# Altium PCB photo_frame-v1.2.PcbDoc (part 3 of 5)
Units mm, origin at the board's own origin, x right, y up, seen from the top; angles counter-clockwise.
Board outline 704 x 370 mm, 2 copper layers (Top Layer, Bottom Layer), stack 1.57 mm thick; 268 components, 235 nets, 1088 pads, 1398 vias.
Unrouted connection lines stored in the file: 10.
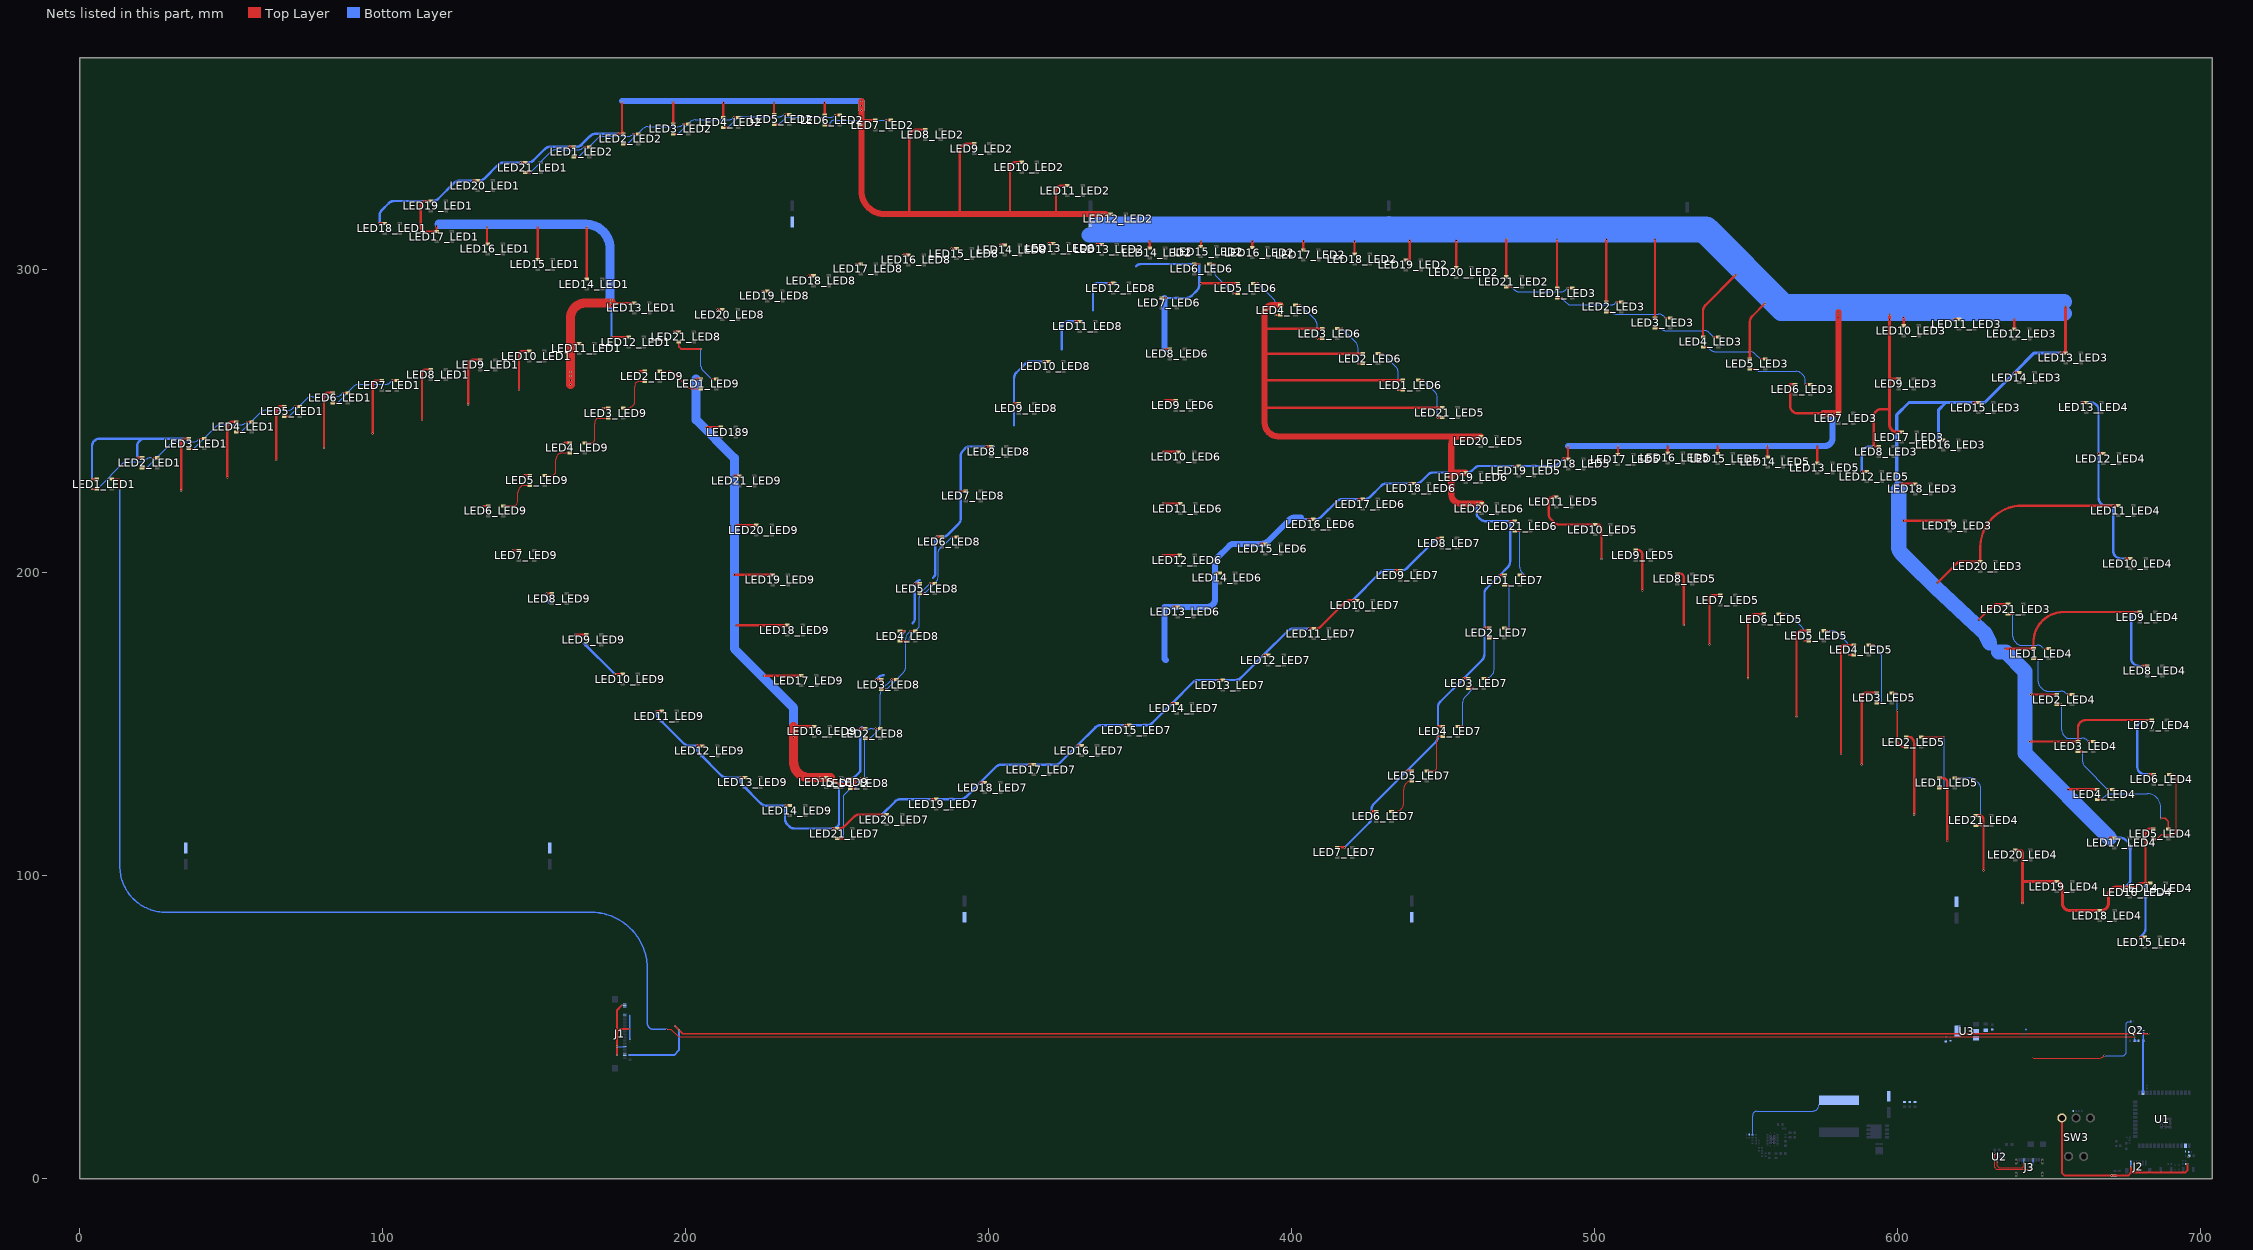
[diagram p2: the nets of this part, all layers, seen from the top]

## Via types
v1: diameter 0.6, hole 0.3, Top Layer to Bottom Layer, 709 vias
v2: diameter 0.6, hole 0.3, Top Layer to Bottom Layer, tented both sides, 689 vias

## Nets (pads, with @x,y where several pads share a name; then routed paths per layer and width w, separated by ;. In a path a pad name is that pad's centre, name@x,y a point inside that pad or via, vN(x,y) a via of type N, cw(c..) or ccw(c..) an arc to the next point about the centre after c; other vN are vias at no path point)
3V3: C1.2 C2.2 C7.1 C11.2 C12.2 D4.2 J1.6 J1.7 J1.12 J1.33 J1.38 J1.39 J1.40 J2.1 Q2.1 R1.1 R2.1 R5.2 R20.1 R23.1 SW3.1 U1.2 U3.2 U3.4 | length 612.3
  Top Layer w0.635: v2(177.444,40.767) v2(177.444,43.536) 177.444,48.336 ; v2(179.019,57.201) 177.444,55.626 177.444,48.336 ; v2(181.61,49.327) 178.435,49.327 177.444,48.336 ; v1(196.596,50.292) 199.109,47.779 211.828,47.779 v1(641.172,47.779) v1(642.422,47.779) v2@682.828,47.779 ; SW3.1@654.296,20.007 654.296,1.925 655.256,0.965 v2(670.712,0.965) 676.123,0.965 677.053,1.896 677.053,2.879 ; v2(677.053,3.858) 677.053,2.879 ; v2(695.811,4.858) 695.811,2.772 695.071,2.032 677.901,2.032 677.053,2.879
  Bottom Layer w0.305: v2(177.444,43.536) 177.419,43.536 177.429,43.546 J1.12@180.165,43.546 ; v2(677.053,3.858) J2.1@677.053,5.137 ; v2@696.112,7.087 v2@696.112,7.112
  Bottom Layer w0.635: R23.1@181.61,45.999 v2(181.61,49.327) 181.61,53.873 ; C7.1@181.686,40.767 196.235,40.767 197.853,42.384 v1(197.853,49.035) v1(196.596,50.292) ; 642.42,49.149 642.422,49.15 ; v2(670.712,0.965) R20.1@671.805,0.965
  other v2: 696.138,7.112 682.835,47.778
5V: C9.2 C10.2 C15.2 C16.2 C17.2 C23.1 C24.1 C25.1 C26.1 C27.1 C28.1 C29.1 C30.1 C31.1 C32.1 L1.2 LED1_LED1.1 LED1_LED2.1 LED1_LED3.1 LED1_LED4.1 LED1_LED5.1 LED1_LED6.1 LED1_LED7.1 LED1_LED8.1 LED1_LED9.1 LED2_LED1.1 LED2_LED2.1 LED2_LED3.1 LED2_LED4.1 LED2_LED5.1 LED2_LED6.1 LED2_LED7.1 LED2_LED8.1 LED2_LED9.1 LED3_LED1.1 LED3_LED2.1 LED3_LED3.1 LED3_LED4.1 LED3_LED5.1 LED3_LED6.1 LED3_LED7.1 LED3_LED8.1 LED3_LED9.1 LED4_LED1.1 LED4_LED2.1 LED4_LED3.1 LED4_LED4.1 LED4_LED5.1 LED4_LED6.1 LED4_LED7.1 LED4_LED8.1 LED4_LED9.1 LED5_LED1.1 LED5_LED2.1 LED5_LED3.1 LED5_LED4.1 LED5_LED5.1 LED5_LED6.1 LED5_LED7.1 LED5_LED8.1 LED5_LED9.1 LED6_LED1.1 LED6_LED2.1 LED6_LED3.1 LED6_LED4.1 LED6_LED5.1 LED6_LED6.1 LED6_LED7.1 LED6_LED8.1 LED6_LED9.1 LED7_LED1.1 LED7_LED2.1 LED7_LED3.1 LED7_LED4.1 LED7_LED5.1 LED7_LED6.1 LED7_LED7.1 LED7_LED8.1 LED7_LED9.1 LED8_LED1.1 LED8_LED2.1 LED8_LED3.1 LED8_LED4.1 LED8_LED5.1 LED8_LED6.1 LED8_LED7.1 LED8_LED8.1 LED8_LED9.1 LED9_LED1.1 LED9_LED2.1 LED9_LED3.1 LED9_LED4.1 LED9_LED5.1 LED9_LED6.1 LED9_LED7.1 LED9_LED8.1 LED9_LED9.1 LED10_LED1.1 LED10_LED2.1 LED10_LED3.1 LED10_LED4.1 LED10_LED5.1 LED10_LED6.1 LED10_LED7.1 LED10_LED8.1 LED10_LED9.1 LED11_LED1.1 LED11_LED2.1 LED11_LED3.1 LED11_LED4.1 LED11_LED5.1 LED11_LED6.1 LED11_LED7.1 LED11_LED8.1 LED11_LED9.1 LED12_LED1.1 LED12_LED2.1 LED12_LED3.1 LED12_LED4.1 LED12_LED5.1 LED12_LED6.1 LED12_LED7.1 LED12_LED8.1 LED12_LED9.1 LED13_LED1.1 LED13_LED2.1 LED13_LED3.1 LED13_LED4.1 LED13_LED5.1 LED13_LED6.1 LED13_LED7.1 LED13_LED8.1 LED13_LED9.1 LED14_LED1.1 LED14_LED2.1 LED14_LED3.1 LED14_LED4.1 LED14_LED5.1 LED14_LED6.1 LED14_LED7.1 LED14_LED8.1 LED14_LED9.1 LED15_LED1.1 LED15_LED2.1 LED15_LED3.1 LED15_LED4.1 LED15_LED5.1 LED15_LED6.1 LED15_LED7.1 LED15_LED8.1 LED15_LED9.1 LED16_LED1.1 LED16_LED2.1 LED16_LED3.1 LED16_LED4.1 LED16_LED5.1 LED16_LED6.1 LED16_LED7.1 LED16_LED8.1 LED16_LED9.1 LED17_LED1.1 LED17_LED2.1 LED17_LED3.1 LED17_LED4.1 LED17_LED5.1 LED17_LED6.1 LED17_LED7.1 LED17_LED8.1 LED17_LED9.1 LED18_LED1.1 LED18_LED2.1 LED18_LED3.1 LED18_LED4.1 LED18_LED5.1 LED18_LED6.1 LED18_LED7.1 LED18_LED8.1 LED18_LED9.1 LED19_LED1.1 LED19_LED2.1 LED19_LED3.1 LED19_LED4.1 LED19_LED5.1 LED19_LED6.1 LED19_LED7.1 LED19_LED8.1 LED19_LED9.1 LED20_LED1.1 LED20_LED2.1 LED20_LED3.1 LED20_LED4.1 LED20_LED5.1 LED20_LED6.1 LED20_LED7.1 LED20_LED8.1 LED20_LED9.1 LED21_LED1.1 LED21_LED2.1 LED21_LED3.1 LED21_LED4.1 LED21_LED5.1 LED21_LED6.1 LED21_LED7.1 LED21_LED8.1 LED21_LED9.1 LED189.1 R6.2 R14.2 R15.2 U3.3 | length 4649.2
  Top Layer w0.381: v1(644.525,39.675) 666.333,39.675 ccw(c666.333,42.215) 668.129,40.419 v2(668.299,40.589)
  Top Layer w0.7: v2(175.567,288.999) LED13_LED1.1@183.067,288.999
  Top Layer w0.762: v2@4.092,230.845 LED1_LED1.1@5.688,230.845 ; v2@19.021,237.902 LED2_LED1.1@20.617,237.902 ; v1(33.528,227.076) 33.528,242.824 cw(c34.907,242.824) 34.907,244.203 ; v2@34.495,244.203 34.907,244.203 ; LED3_LED1.1@36.091,244.203 34.907,244.203 ; v1(48.768,231.394) 48.768,248.158 cw(c50.374,248.158) 50.374,249.764 LED4_LED1.1@51.783,249.764 ; v1(64.934,237.161) v1(64.934,237.161) 64.936,253.6 cw(c66.205,253.6) 66.205,254.869 LED5_LED1.1@67.632,254.869 ; v1(80.715,241.103) 80.715,258.071 cw(c81.984,258.071) 81.984,259.34 LED6_LED1.1@83.558,259.34 ; v1(96.738,245.908) 96.738,262.185 cw(c97.956,262.185) 97.956,263.404 LED7_LED1.1@99.763,263.404 ; v2@99.074,315.289 LED18_LED1.1@100.669,315.289 ; v1(113.03,250.444) 113.03,265.938 cw(c114.102,265.938) 114.102,267.01 LED8_LED1.1@115.892,267.01 ; LED19_LED1.1@115.943,322.661 115.941,322.66 114.349,322.66 v2(114.347,322.658) ccw(c114.347,320.954) 113.142,322.159 113.106,322.123 ccw(c114.21,321.019) 112.649,321.019 112.649,314.302 ccw(c114.557,314.302) 113.208,312.953 ccw(c114.137,313.883) 114.137,312.568 LED17_LED1.1@117.852,312.568 v2@117.852,314.286 ; v1(128.27,255.524) 128.27,268.732 cw(c129.766,268.732) 129.766,270.228 LED9_LED1.1@132.213,270.228 ; v2@129.849,329.361 LED20_LED1.1@131.444,329.361 ; v2@133.245,222.002 LED6_LED9.1@134.841,222.002 ; v2(134.466,313.944) 134.466,308.727 ccw(c134.666,308.727) LED16_LED1.1@134.666,308.527 ; v2(143.002,207.321) 143.028,207.295 LED7_LED9.1@145.026,207.295 ; v1(145.034,260.35) 145.034,271.78 cw(c146.386,271.78) 146.386,273.132 LED10_LED1.1@148.455,273.132 ; v2@145.564,335.336 LED21_LED1.1@147.16,335.336 ; v2@146.961,232.085 LED5_LED9.1@148.557,232.085 ; LED15_LED1.1@151.259,303.381 v2(151.259,314.069) ; v2@154.226,193.096 LED8_LED9.1@155.821,193.096 ; v2@160.169,242.804 LED4_LED9.1@161.765,242.804 ; v2@161.592,340.518 LED1_LED2.1@163.187,340.518 ; 162.052,274.32 cw(c163.353,274.32) 163.353,275.621 LED11_LED1.1@164.864,275.621 ; v2(163.512,179.508) 163.539,179.482 LED9_LED9.1@167.2,179.482 ; LED14_LED1.1@167.458,296.873 v2(167.458,313.872) ; v2@172.895,254.285 LED3_LED9.1@174.49,254.285 ; v2(175.565,277.751) v2(175.565,277.751) LED12_LED1.1@181.28,277.749 ; v2(176.634,166.503) LED10_LED9.1@179.265,166.503 ; v2@177.822,344.811 LED2_LED2.1@179.418,344.811 cw(c180.257,345.65) 179.07,345.65 v2(179.07,355.346) ; v2@184.909,266.452 LED2_LED9.1@186.504,266.452 ; v2@190.522,154.285 LED11_LED9.1@192.118,154.285 ; v2(195.834,355.346) 195.928,355.252 LED3_LED2.1@195.928,348.062 ; v2@196.186,279.456 LED21_LED8.1@197.782,279.456 ; v2@203.502,263.937 LED1_LED9.1@205.097,263.937 ; v2@203.883,142.83 LED12_LED9.1@205.478,142.83 ; v2(206.756,247.904) 206.889,248.037 LED189.1@211.65,248.037 ; v2@210.588,286.822 LED20_LED8.1@212.184,286.822 ; LED4_LED2.1@212.489,350.221 v2(212.489,355.092) ; v2(216.125,199.275) 216.157,199.243 LED19_LED9.1@228.77,199.243 ; v2@216.125,231.933 LED21_LED9.1@217.721,231.933 ; v2(216.662,182.626) 216.668,182.632 LED18_LED9.1@233.647,182.632 ; v2(216.662,215.646) 216.668,215.652 LED20_LED9.1@223.411,215.652 ; v2@218.056,132.39 LED13_LED9.1@219.651,132.39 ; v2@225.396,292.944 LED19_LED8.1@226.992,292.944 ; v2(225.806,165.862) 225.914,165.97 LED17_LED9.1@238.208,165.97 ; LED5_LED2.1@229.227,351.262 v2(229.227,355.092) ; v2@232.864,123.094 LED14_LED9.1@234.46,123.094 ; v2@240.662,297.973 LED18_LED8.1@242.257,297.973 ; LED6_LED2.1@245.94,350.983 v2(245.94,355.092) ; v2(247.904,132.378) 248.149,132.378 248.837,131.69 249.684,130.843 ccw(c251.48,132.639) 251.48,130.099 255.19,130.099 ccw(c255.19,130.966) 255.803,130.353 255.875,130.424 ccw(c255.311,130.988) 256.108,130.988 256.108,131.371 ccw(c255.501,131.371) 255.93,131.801 ccw(c255.304,131.174) 255.304,132.06 LED1_LED8.1@254.399,132.06 v2@252.803,132.06 ; v2@248.465,115.533 LED21_LED7.1@250.06,115.533 250.701,115.533 ccw(c250.701,118.073) 252.497,116.276 255.62,119.4 cw(c257.417,117.604) 257.417,120.144 v2(264.893,120.144) ; v2@256.257,301.859 LED17_LED8.1@257.853,301.859 ; v2@257.705,148.494 LED2_LED8.1@259.301,148.494 ; 258.064,348.496 cw(c258.899,348.496) 258.899,349.332 LED7_LED2.1@262.679,349.332 ; v2@263.014,164.699 LED3_LED8.1@264.609,164.699 ; v2@264.893,120.148 LED20_LED7.1@266.489,120.148 ; LED4_LED8.1@270.807,180.676 v2@272.403,180.676 ; v2@271.991,304.855 LED16_LED8.1@273.586,304.855 ; 273.812,318.366 273.812,343.668 cw(c276.352,343.668) 276.352,346.208 LED8_LED2.1@279.189,346.208 ; v2@275.688,196.373 LED5_LED8.1@277.284,196.373 ; v2@281.149,125.228 LED19_LED7.1@282.745,125.228 ; v2@282.978,211.816 LED6_LED8.1@284.574,211.816 ; v2@287.855,306.939 LED15_LED8.1@289.451,306.939 ; 290.667,318.366 cw(c290.667,318.457) 290.576,318.457 290.576,339.045 cw(c293.116,339.045) 293.116,341.585 LED9_LED2.1@295.318,341.585 ; v2@290.852,226.929 LED7_LED8.1@292.448,226.929 ; v2@297.253,130.663 LED18_LED7.1@298.849,130.663 ; v2@299.285,241.585 LED8_LED8.1@300.881,241.585 ; v2@303.806,308.184 LED14_LED8.1@305.402,308.184 ; 307.447,318.366 cw(c307.447,318.727) 307.086,318.727 307.086,333.756 cw(c308.768,333.756) 308.768,335.438 LED10_LED2.1@311.015,335.438 ; v2@308.454,255.885 LED9_LED8.1@310.05,255.885 ; v2@313.331,136.581 LED17_LED7.1@314.927,136.581 ; v2@318.132,269.677 LED10_LED8.1@319.727,269.677 ; v2@319.797,308.667 LED13_LED8.1@321.393,308.667 ; 322.572,318.366 cw(c322.572,318.612) 322.326,318.612 322.326,325.994 cw(c324.045,325.994) 324.045,327.713 324.482,327.713 ; 324.482,327.716 LED11_LED2.1@326.077,327.716 ; v2@328.597,282.911 LED11_LED8.1@330.192,282.911 ; v2@329.232,142.855 LED16_LED7.1@330.827,142.855 ; v2@335.759,308.336 LED13_LED2.1@337.355,308.336 ; v2@338.68,318.369 LED12_LED2.1@340.276,318.369 ; v2@339.646,295.509 LED12_LED8.1@341.241,295.509 ; v2@344.929,149.662 LED15_LED7.1@346.524,149.662 ; LED14_LED2.1@353.27,307.167 v2(353.27,309.372) ; LED7_LED6.1@357.198,290.636 v2@358.794,290.636 ; v2(357.553,205.721) LED12_LED6.1@363.125,205.721 ; v1(357.632,222.789) LED11_LED6.1@363.288,222.789 ; v2(357.632,239.854) 357.635,239.858 LED10_LED6.1@362.857,239.858 ; v2(358.143,256.875) LED9_LED6.1@361.754,256.875 ; v2@358.238,273.818 LED8_LED6.1@359.834,273.818 ; v2@360.55,156.825 LED14_LED7.1@362.145,156.825 ; v2@360.931,188.677 LED13_LED6.1@362.526,188.677 ; LED6_LED6.1@367.965,301.864 v2@369.561,301.864 ; v1(370.078,295.465) LED5_LED6.1@382.348,295.465 ; LED15_LED2.1@370.146,307.561 v2(370.146,309.372) ; v2@374.774,199.878 LED14_LED6.1@376.369,199.878 ; v2@375.775,164.546 LED13_LED7.1@377.371,164.546 ; LED16_LED2.1@387.081,307.244 v2(387.081,309.372) ; v2@389.76,209.505 LED15_LED6.1@391.355,209.505 ; v2@390.801,172.776 LED12_LED7.1@392.397,172.776 ; 391.16,279.933 cw(c391.736,279.933) 391.736,280.509 LED3_LED6.1@410.134,280.509 LED3_LED6.1@410.642,280.509 ; LED4_LED6.1@396.342,288.276 LED4_LED6.1@396.888,288.276 ; LED17_LED2.1@403.923,306.495 v2(403.923,309.372) ; v2@405.533,217.607 LED16_LED6.1@407.129,217.607 ; v2@405.711,181.489 LED11_LED7.1@407.307,181.489 408.117,181.489 ccw(c408.117,183.551) 409.575,182.093 417.571,190.088 cw(c419.367,188.292) 419.367,190.832 v2(420.189,190.832) ; LED7_LED7.1@415.079,109.327 417.57,109.327 v2(417.576,109.322) ; v2@420.189,190.836 LED10_LED7.1@421.785,190.836 ; LED18_LED2.1@420.83,305.139 v2(420.83,309.372) ; v2@421.942,224.237 LED17_LED6.1@423.537,224.237 ; v2@426.437,121.214 LED6_LED7.1@428.033,121.214 ; v2@434.311,200.742 LED9_LED7.1@435.907,200.742 ; LED19_LED2.1@437.672,303.225 v2(439.004,303.225) 439.004,309.534 v2(438.912,309.626) ; v2@438.121,134.575 LED5_LED7.1@439.717,134.575 ; v2@438.731,229.418 LED18_LED6.1@440.327,229.418 ; v2@448.053,211.359 LED8_LED7.1@449.648,211.359 ; v2@448.358,149.256 LED4_LED7.1@449.953,149.256 ; v1(454.406,309.626) cw(c454.406,309.606) 454.426,309.606 LED20_LED2.1@454.426,300.76 ; v2@456.841,165.08 LED3_LED7.1@458.437,165.08 ; v2@463.699,181.768 LED2_LED7.1@465.295,181.768 ; v2@468.728,199.142 LED1_LED7.1@470.324,199.142 ; LED21_LED2.1@470.948,297.642 470.948,309.912 v2(471.17,310.134) ; v2@472.183,216.972 LED21_LED6.1@473.778,216.972 ; v2@473.405,235.206 LED19_LED5.1@475.001,235.206 ; LED11_LED5.1@487.342,225.024 486.387,225.024 ccw(c486.387,223.623) 485.395,224.614 485.242,224.46 ccw(c486.039,223.663) 484.911,223.663 484.911,219.365 ccw(c487.451,219.365) 485.655,217.569 486.629,216.595 ccw(c488.425,218.391) 488.425,215.851 498.624,215.851 ; LED1_LED3.1@487.672,293.884 487.672,309.872 v2(487.68,309.88) ; v2@489.703,237.558 LED18_LED5.1@491.298,237.558 v2(491.298,241.808) ; 498.624,215.855 LED10_LED5.1@500.22,215.855 501.038,215.855 cw(c501.038,214.365) 501.88,215.594 ; 501.879,215.595 cw(c500.713,214.43) 501.88,215.594 ; v1(502.361,204.47) 502.361,214.43 ccw(c500.713,214.43) 502.352,214.599 ccw(c500.713,214.43) 501.88,215.594 ; LED2_LED3.1@503.928,289.337 503.928,309.872 v2(503.936,309.88) ; LED17_LED5.1@507.781,238.981 v2(507.781,241.808) ; LED9_LED5.1@513.58,207.371 514.509,207.371 cw(c514.509,206.051) 515.442,206.985 cw(c514.584,206.126) 515.798,206.126 v1(515.798,194.132) ; v2(519.938,309.88) 520.006,309.812 LED3_LED3.1@520.006,284.054 ; LED16_LED5.1@524.214,239.543 v2(524.214,241.808) ; LED8_LED5.1@527.347,199.573 528.504,199.573 cw(c528.504,198.683) 529.134,199.313 cw(c528.34,198.518) 529.463,198.518 v1(529.463,182.753) ; LED4_LED3.1@535.856,277.78 535.856,286.392 cw(c538.396,286.392) 536.6,288.188 v1(546.608,298.196) ; 535.856,281.263 535.856,281.265 ; v1(537.972,176.276) 537.972,191.262 cw(c539.273,191.262) 539.273,192.563 LED7_LED5.1@541.495,192.563 ; LED15_LED5.1@540.69,239.299 v2(540.69,241.808) ; v1(550.672,165.1) 550.672,183.75 cw(c553.212,183.75) 553.212,186.29 LED6_LED5.1@555.882,186.29 ; LED5_LED3.1@551.325,270.541 551.325,282.81 cw(c553.865,282.81) 552.069,284.607 v1(556.26,288.798) ; LED14_LED5.1@557.148,238.227 v2(557.148,241.808) ; 564.615,262.14 564.615,255.016 ccw(c567.046,255.016) 567.046,252.585 v2(575.564,252.585) ; 564.615,262.143 LED6_LED3.1@566.211,262.143 ; v1(566.674,152.4) 566.674,179.153 cw(c568.324,179.153) 568.324,180.803 LED5_LED5.1@570.679,180.803 ; LED13_LED5.1@573.557,236.22 v2(573.557,241.808) ; v1(581.403,140.211) 581.403,174.896 cw(c582.636,174.896) 582.636,176.129 LED4_LED5.1@585.538,176.129 586.3,176.129 ; v1(588.144,136.652) 588.264,136.772 588.264,159.004 cw(c589.565,159.004) 589.565,160.305 LED3_LED5.1@593.184,160.305 ; v2@588.225,233.306 LED12_LED5.1@589.82,233.306 ; v2(592.197,241.586) 592.197,251.399 cw(c594.737,251.399) 594.737,253.939 597.408,253.939 ; v2@592.197,241.59 LED8_LED3.1@593.792,241.59 ; 597.408,263.934 LED9_LED3.1@600.463,263.934 ; v1(600.964,229.305) 600.967,229.308 LED18_LED3.1@605.878,229.308 ; v1(601.98,217.098) LED19_LED3.1@617.254,217.098 ; LED10_LED3.1@602.079,281.475 v1(602.079,284.226) ; LED2_LED5.1@602.861,145.7 604.158,145.7 cw(c604.158,144.9) 604.723,145.466 cw(c602.792,143.534) 605.523,143.534 605.523,120.155 v1(605.536,120.142) ; v1(613.156,196.596) 619.495,202.935 cw(c621.291,201.139) 621.291,203.679 LED20_LED3.1@627.378,203.679 627.378,208.278 cw(c641.181,208.278) 641.181,222.081 LED11_LED4.1@672.838,222.081 ; v2@613.498,243.792 LED16_LED3.1@615.093,243.792 ; LED1_LED5.1@613.877,132.244 614.654,132.244 cw(c614.654,130.124) 616.153,131.623 cw(c615.479,130.948) 616.433,130.948 616.433,111.531 v1(616.458,111.506) ; v2@618.74,283.67 LED11_LED3.1@620.336,283.67 ; v2@625.054,256.113 LED15_LED3.1@626.65,256.113 ; LED21_LED4.1@625.957,119.862 627.144,119.862 cw(c627.144,118.737) 627.939,119.532 cw(c626.687,118.28) 628.457,118.28 v1(628.457,101.661) ; v1(626.872,184.404) 631.283,188.815 cw(c633.079,187.019) 633.079,189.559 LED21_LED3.1@636.52,189.559 ; v1(635.508,174.885) 635.511,174.888 LED1_LED4.1@644.935,174.888 644.935,177.067 cw(c654.849,177.067) 654.849,186.981 LED9_LED4.1@680.074,186.981 ; LED12_LED3.1@638.551,280.465 v1(638.551,283.667) ; v2@638.666,265.969 LED14_LED3.1@640.261,265.969 ; LED20_LED4.1@638.931,108.464 640.342,108.464 cw(c640.342,107.456) 641.35,107.456 641.35,105.664 ; v2(643.636,144.272) 643.642,144.278 LED3_LED4.1@659.614,144.278 659.614,148.78 cw(c662.154,148.78) 662.154,151.32 LED7_LED4.1@683.974,151.32 ; v2(643.912,159.744) LED2_LED4.1@652.642,159.744 ; v2(656.402,128.458) LED4_LED4.1@665.941,128.458 ; 656.978,88.49 ccw(c657.496,90.976) 657.496,88.436 ; v2@660.683,256.148 LED13_LED4.1@662.279,256.148 ; v2@666.409,239.237 LED12_LED4.1@668.004,239.237 ; v2@670.02,112.455 LED17_LED4.1@671.615,112.455 ; v2(675.132,204.632) ccw(c675.158,204.632) 675.158,204.606 LED10_LED4.1@676.918,204.606 ; LED16_LED4.1@676.773,96.19 677.687,96.19 ccw(c677.687,98.73) 679.483,96.934 679.704,97.155 cw(c680.602,96.257) 680.602,97.527 v2(681.896,97.527) v2@681.896,97.53 ; v2@680.191,79.731 LED15_LED4.1@681.787,79.731 ; v2@680.899,169.203 LED8_LED4.1@682.495,169.203 ; 682.857,115.422 682.64,115.204 ccw(c684.436,113.408) 681.896,113.408 v2@681.896,97.53 ; 682.857,115.425 LED5_LED4.1@684.453,115.425 ; v2@683.092,133.392 LED6_LED4.1@684.688,133.392 ; LED14_LED4.1@683.491,97.53 v2@681.896,97.53
  Top Layer w0.786: 391.16,254.254 cw(c391.338,254.254) 391.338,254.432 LED21_LED5.1@449.808,254.432 ; 391.16,263.398 cw(c391.291,263.398) 391.291,263.529 LED1_LED6.1@436.805,263.529 ; 391.16,271.78 cw(c391.618,271.78) 391.618,272.238 LED2_LED6.1@423.571,272.238
  Top Layer w1: v2(235.712,149.245) 235.715,149.248 LED16_LED9.1@242.569,149.248 ; LED15_LED9.1@246.518,132.378 v2(247.904,132.378) ; v1(597.408,284.988) v1(597.408,283.464) 597.408,263.934 597.408,253.939 597.408,248.893 ccw(c599.948,248.893) 599.948,246.353 LED17_LED3.1@601.39,246.353 ; v1(641.35,90.932) 641.35,98.016 ; 641.35,105.664 641.35,98.016 ; LED19_LED4.1@652.987,98.016 LED19_LED4.1@652.658,98.016 ; v2@653.92,272.52 LED13_LED3.1@655.515,272.52 v1(655.515,287.723) ; LED16_LED4.1@676.773,96.19 672.225,96.19 ccw(c672.225,93.65) 669.685,93.65 669.685,90.976 cw(c667.145,90.976) 667.145,88.436 657.496,88.436 656.967,88.436 cw(c656.967,90.976) 654.427,90.976 654.427,96.247 ccw(c652.658,96.247) LED19_LED4.1@652.658,98.016 ; 641.35,98.016 LED19_LED4.1@652.658,98.016
  Top Layer w2: v2(258.064,355.6) 258.064,348.496 258.064,325.961 ccw(c265.659,325.961) 265.659,318.366 273.812,318.366 290.667,318.366 307.447,318.366 322.572,318.366 v2(336.155,318.366) v2(337.494,318.366) v2(338.68,318.366) ; LED4_LED6.1@396.342,288.276 393.7,288.276 ccw(c393.7,285.736) 391.16,285.736 391.16,279.933 391.16,271.78 391.16,263.398 391.16,254.254 391.16,249.537 ccw(c395.733,249.537) 395.733,244.964 455.295,244.964 ; v2(455.876,233.047) 453.382,233.047 ccw(c453.382,232.16) 452.755,232.787 ; v2@455.876,233.051 LED19_LED6.1@457.472,233.051 ; v2(461.21,222.76) v2(458.739,222.76) 455.954,222.76 cw(c455.954,225.96) 452.755,225.96 452.755,232.787 ; v2@461.21,222.764 LED20_LED6.1@462.806,222.764 ; LED20_LED5.1@462.562,244.964 455.295,244.964 ; v2@575.564,252.588 v2(577.088,252.588) v2(578.612,252.588) LED7_LED3.1@580.5,252.588 v1(580.5,283.972) v2(580.5,284.988) v2(580.5,286.004) ; 452.755,232.787 452.755,242.424 cw(c455.295,242.424) 455.295,244.964
  Top Layer w3: v2(162.052,262.128) v2(162.052,263.483) v2(162.052,264.837) v1(162.052,266.192) 162.052,274.32 162.052,283.995 cw(c167.056,283.995) 167.056,288.999 v2(174.498,288.999) v2(175.567,288.999) ; v2(235.712,149.245) v2(235.712,148.101) v2(235.712,146.847) v2(235.712,145.633) 235.712,137.418 ccw(c240.752,137.418) 240.752,132.378 v2(244.348,132.378) LED15_LED9.1@246.414,132.378 v2(247.904,132.378)
  Bottom Layer w0.381: R15.2@552.242,14.414 cw(c552.242,14.46) 552.196,14.46 552.196,20.793 cw(c553.635,20.793) 553.635,22.231 571.97,22.231 ccw(c571.97,24.301) 574.04,24.301 ; v2(668.299,40.589) 674.716,40.589 675.538,41.412 675.538,51.276 676.079,51.816 R6.2@676.989,51.816
  Bottom Layer w0.762: v2(4.092,230.842) 4.092,241.659 cw(c6.632,241.659) 6.632,244.199 v2(34.495,244.199) ; v2(19.021,237.899) 19.021,241.659 cw(c21.561,241.659) 21.561,244.199 ; v2(154.226,193.093) 154.226,191.91 ccw(c156.766,191.91) 154.97,190.114 ; v2(163.512,179.508) 163.975,179.046 ; 166.349,176.787 v2(176.634,166.503) ; v2(175.565,277.751) v2(175.565,288.073) ; v2(190.522,154.282) 190.522,153.557 ccw(c193.062,153.557) 191.266,151.761 199.457,143.57 ccw(c201.253,145.366) 201.253,142.826 v2(203.883,142.826) 203.883,142.051 ccw(c206.423,142.051) 204.627,140.255 211.75,133.131 ccw(c213.546,134.927) 213.546,132.387 v2(218.056,132.387) 218.056,131.688 ccw(c220.596,131.688) 218.8,129.891 224.866,123.825 ccw(c226.639,125.598) 226.639,123.091 v2(232.864,123.091) 232.864,118.683 ccw(c235.404,118.683) 233.608,116.887 234.222,116.273 ccw(c236.018,118.069) 236.018,115.529 v2(248.465,115.529) ccw(c248.465,117.941) 250.17,116.235 250.342,116.408 ccw(c249.607,117.144) 250.647,117.144 250.647,128.716 250.647,128.718 cw(c253.503,128.718) 251.484,130.738 v2(252.803,132.057) 254.347,132.057 ccw(c254.347,134.597) 256.143,132.801 257.429,134.087 ccw(c256.762,134.753) 257.705,134.753 v2(257.705,148.491) 258.28,149.065 ; 216.125,215.929 216.379,215.929 v2(216.662,215.646) ; v2(263.014,164.696) 263.741,165.423 cw(c265.537,163.627) 265.537,166.167 ; v2(264.893,120.144) 269.229,124.48 cw(c271.025,122.684) 271.025,125.224 v2(281.149,125.224) 290.765,125.224 ccw(c290.765,127.764) 292.561,125.968 v2(297.253,130.66) 302.427,135.834 cw(c304.223,134.038) 304.223,136.578 v2(313.331,136.578) 321.906,136.578 ccw(c321.906,139.118) 323.702,137.322 v2(329.232,142.852) 335.295,148.915 cw(c337.091,147.119) 337.091,149.659 v2(344.929,149.659) 352.335,149.659 ccw(c352.335,152.199) 354.131,150.403 v2(360.55,156.822) 367.526,163.798 cw(c369.322,162.002) 369.322,164.542 v2(375.775,164.542) 381.518,164.542 ccw(c381.518,167.082) 383.315,165.286 v2(390.801,172.773) 398.769,180.741 cw(c400.565,178.945) 400.565,181.485 v2(405.711,181.485) ; 271.297,178.522 cw(c273.837,178.522) 272.041,180.318 v2(272.403,180.679) ; 274.944,183.221 ccw(c273.148,185.017) 275.688,185.017 v2(275.688,196.376) 276.18,196.868 cw(c277.976,195.072) 277.32,197.526 ; 281.683,198.27 282.016,198.603 ccw(c280.974,199.645) 282.448,199.645 282.448,210.54 cw(c284.258,210.54) v2(282.978,211.82) 284.975,211.82 ccw(c284.975,213.957) 286.487,212.446 290.108,216.067 ccw(c288.312,217.863) 290.852,217.863 v2(290.852,226.933) 290.852,238.441 cw(c293.392,238.441) 291.596,240.237 292.633,241.275 cw(c293.391,240.517) 293.391,241.588 v2(299.285,241.588) 301.771,241.588 ; 308.454,248.546 v2(308.454,255.889) 308.454,264.171 cw(c310.994,264.171) 309.198,265.968 312.242,269.011 cw(c313.858,267.395) 313.858,269.681 v2(318.132,269.681) 320.278,269.681 ; 324.206,273.609 324.206,281.317 cw(c325.402,281.317) 324.556,282.163 cw(c326.352,280.367) 326.352,282.907 v2(328.597,282.907) 330.827,282.907 ; 334.518,286.599 334.518,294.49 cw(c335.125,294.49) 334.696,294.919 cw(c336.112,293.504) 336.112,295.506 v2(339.646,295.506) 342.028,295.506 ; 348.697,301.123 cw(c350.493,299.327) 350.493,301.867 v2(369.561,301.867) 369.561,294.921 cw(c367.021,294.921) 368.817,293.125 367.069,291.377 cw(c365.273,293.173) 365.273,290.633 v2(358.794,290.633) ccw(c360.134,289.293) 358.238,289.293 v2(358.238,273.814) ; 401.3,217.421 cw(c402.247,215.064) 402.247,217.604 v2(405.533,217.604) 407.992,217.604 ccw(c407.992,220.144) 409.788,218.348 414.929,223.489 cw(c416.725,221.693) 416.725,224.233 v2(421.942,224.233) 424.172,224.233 ccw(c424.172,226.773) 425.968,224.977 429.661,228.671 cw(c431.457,226.875) 431.457,229.415 v2(438.731,229.415) 441.139,229.415 ccw(c441.139,231.955) 442.935,230.159 445.079,232.303 cw(c446.875,230.507) 446.875,233.047 v2(455.876,233.047) 457.979,233.047 ccw(c457.979,235.587) 459.775,233.791 460.443,234.459 cw(c462.239,232.663) 462.239,235.203 v2(473.405,235.203) 486.299,235.203 ccw(c486.299,237.743) 488.095,235.947 v2(489.703,237.554) ; v2(417.576,109.322) 425.693,117.439 ccw(c423.897,119.235) 426.437,119.235 v2(426.437,121.211) 426.437,121.835 cw(c428.977,121.835) 427.181,123.631 v2(438.121,134.571) 447.614,144.064 ccw(c445.818,145.86) 448.358,145.86 v2(448.358,149.253) 448.358,155.541 cw(c450.898,155.541) 449.102,157.337 v2(456.841,165.077) 462.955,171.191 ccw(c461.159,172.987) 463.699,172.987 v2(463.699,181.765) 463.699,193.057 cw(c466.239,193.057) 464.443,194.853 v2(468.728,199.138) 471.439,201.849 ccw(c469.643,203.645) 472.183,203.645 v2(472.183,216.969) 464.066,216.969 cw(c464.066,219.509) 462.27,217.713 461.467,218.516 cw(c462.088,219.137) 461.21,219.137 v2(461.21,222.76) ; v2(420.189,190.832) 429.351,199.994 cw(c431.147,198.198) 431.147,200.738 v2(434.311,200.738) 436.383,200.738 ccw(c436.383,203.278) 438.18,201.482 v2(448.053,211.356) ; 469.9,310.134 v2(471.17,310.134) ; v2(588.225,233.302) 588.225,239.046 cw(c590.765,239.046) 590.765,241.586 v2(592.197,241.586) ; v2(660.683,256.144) 663.869,256.144 cw(c663.869,253.604) 666.409,253.604 v2(666.409,239.234) 666.409,224.617 ccw(c668.949,224.617) 668.949,222.077 v2(671.242,222.077) 671.242,207.172 ccw(c673.782,207.172) 673.782,204.632 v2(675.132,204.632) ; v2(670.02,112.452) 673.617,112.452 cw(c673.617,109.912) 675.413,111.708 676.115,111.005 cw(c674.319,109.209) 676.859,109.209 676.859,98.349 cw(c675.698,98.349) 676.519,97.527 v2(675.178,96.186) ; v2(678.478,186.978) ccw(c678.478,185.664) 677.164,185.664 677.164,171.74 ccw(c679.704,171.74) 679.704,169.2 v2(680.899,169.2) ; v2(680.191,79.734) 681.152,80.695 ccw(c679.356,82.491) 681.896,82.491 v2(681.896,97.527) ; v2(682.379,151.316) 681.736,151.316 ccw(c681.736,148.776) 679.196,148.776 679.196,135.929 ccw(c681.736,135.929) 681.736,133.389 v2(683.092,133.389)
  Bottom Layer w0.8: v2(99.074,315.286) 99.074,317.884 cw(c101.614,317.884) 99.818,319.68 102.052,321.914 cw(c103.848,320.118) 103.848,322.658 v2(114.347,322.658) 116.602,322.658 ccw(c116.602,325.198) 118.399,323.402 123.611,328.614 cw(c125.407,326.818) 125.407,329.358 v2(129.849,329.358) 131.888,329.358 ccw(c131.888,331.898) 133.684,330.102 138.171,334.589 cw(c139.967,332.793) 139.967,335.333 v2(145.564,335.333) 148.048,335.333 ccw(c148.048,337.873) 149.844,336.077 153.538,339.771 cw(c155.334,337.975) 155.334,340.515 v2(161.592,340.515) 163.923,340.515 ccw(c163.923,343.055) 165.719,341.259 168.524,344.063 cw(c170.32,342.267) 170.32,344.807 v2(177.822,344.807)
  Bottom Layer w1: 600.456,227.584 599.794,228.246 v2(599.794,246.35) 599.794,252.068 603.836,256.11 616.028,256.11 ; v2(613.498,243.789) 613.498,253.58 616.028,256.11 ; v2(653.92,272.517) 645.217,272.517 v2(638.666,265.965) 628.81,256.11 v2(625.054,256.11) 616.028,256.11
  Bottom Layer w2: v2@179.07,355.6 212.489,355.6 229.227,355.6 245.94,355.6 v2(258.064,355.6) v2(258.064,354.076) v2(258.064,352.552) ; v2@358.14,273.814 358.14,290.633 ; 358.648,171.196 cw(c358.648,171.704) 358.14,171.704 358.14,188.673 v2(360.931,188.673) 372.234,188.673 ccw(c372.234,191.213) 374.774,191.213 v2(374.774,199.875) 374.774,203.084 cw(c377.314,203.084) 375.518,204.881 379.395,208.757 cw(c381.191,206.961) 381.191,209.501 v2(389.76,209.501) 390.313,209.501 ccw(c390.313,212.041) 392.109,210.245 399.227,217.363 cw(c401.024,215.567) 401.024,218.107 403.098,218.107 ; v2(491.298,241.808) v2(540.69,241.808) v2(557.148,241.808) v2(573.557,241.808) 576.072,241.808 ccw(c576.072,244.348) 578.612,244.348 v2(578.612,252.588) 578.612,252.585 v2(575.564,252.585)
  Bottom Layer w3: 118.612,314.96 167.112,314.96 cw(c167.112,306.972) 175.1,306.972 175.1,288.544 ; v2(203.502,263.934) 203.502,250.396 216.125,237.773 v2(216.125,231.93) 216.125,215.929 216.125,213.106 ; v2(216.125,199.275) 216.125,213.106 ; v2(235.712,145.633) v2(235.712,146.847) v2(235.712,148.101) v2(235.712,149.245) 235.712,155.315 216.125,174.902 216.125,213.106
  Bottom Layer w5: 333.248,311.404 534.176,311.404 ; 336.55,315.468 ccw(c337.036,315.468) 337.036,314.982 511.965,314.982 ; 600.456,227.584 600.456,208.316 ccw(c602.996,208.316) 601.2,206.52 604.52,203.2 ; 602.488,205.232 604.52,203.2 ; 630.428,176.784 629.095,179.721 625.571,183.01 612.648,195.072 604.52,203.2 ; 633.375,173.737 635.752,173.737 642.112,167.376 642.112,140.359 v2(670.02,112.452) ; 655.066,285.496 561.39,285.496 536.226,310.66 ccw(c534.43,308.864) 534.43,311.404 534.176,311.404 ; 655.066,289.406 563.272,289.406 538.44,314.238 ccw(c536.644,312.442) 536.644,314.982 511.965,314.982 ; 511.965,314.982 511.976,314.982 cw(c511.972,244.293) 534.176,311.404
  other v2: 133.245,221.998 146.961,232.082 160.169,242.801 172.895,254.282 184.909,266.448 196.186,279.453 618.74,283.666 210.588,286.819 174.498,288.073 174.498,289.942 175.565,289.942 225.396,292.94 240.662,297.97 256.257,301.856 271.991,304.852 287.855,306.936 303.806,308.18 335.759,308.333 319.797,308.664 117.881,314.315
CC1: J3.A5 U2.1 | length 21
  Top Layer w0.203: v2(632.133,8.236) 632.133,3.664 632.673,3.124 v2(644.274,3.124)
  Bottom Layer w0.203: v2(632.133,8.236) 632.149,8.22 U2.1@632.956,8.22 ; v2(644.274,3.124) 644.274,4.77 644.774,5.27 J3.A5@644.774,6.162
CC2: J3.B5 U2.6 | length 13.4
  Top Layer w0.203: v2(632.946,5.62) 632.946,4.213 633.535,3.624 641.394,3.624 641.782,4.011 v2(641.782,5.105)
  Bottom Layer w0.203: v2(632.946,5.62) 632.956,5.63 U2.6@632.956,6.22 ; v2@641.774,5.113 J3.B5@641.774,6.162
DIN: LED1_LED1.4 R8.2 R24.2 | length 837.6
  Top Layer w0.305: LED1_LED1.4@10.688,230.845 10.754,230.911 12.954,230.911 13.31,230.556 v2(13.31,227.508) ; v1(193.7,49.276) 195.18,49.276 197.719,46.737 v2@678.34,46.737
  Bottom Layer w0.381: v2(678.347,46.736) 678.34,46.73 678.34,45.508 R8.2@678.334,45.502 R24.2@679.585,45.502
  Bottom Layer w0.508: v2(13.31,227.508) 13.31,103.028 ccw(c28.454,103.028) 28.454,87.884 168.762,87.884 cw(c168.762,69.22) 187.427,69.22 187.427,51.251 ccw(c189.401,51.251) 189.401,49.276 ; 189.133,49.294 193.682,49.294 cw(c193.682,49.276) v1(193.7,49.276)
DIN#: Q2.2 R5.1 R24.1 U1.26 | length 21
  Bottom Layer w0.559: Q2.2@679.92,47.926 679.93,47.936 R5.1@681.206,47.936 ; U1.26@681.093,28.3 R24.1@681.093,45.486 ; R24.1@681.109,45.502 681.18,45.573 681.18,47.936 681.206,47.962 R5.1@681.213,47.962
DIN_LED2: LED1_LED2.4 LED21_LED1.2 | length 24.3
  Top Layer w0.559: LED21_LED1.2@147.16,332.036 v2@148.755,332.036 ; v2@166.592,340.518 LED1_LED2.4@168.187,340.518
  Bottom Layer w0.305: v2(148.755,332.033) 155.558,338.835 cw(c157.354,337.039) 157.354,339.579 164.597,339.579 ccw(c164.597,342.119) 166.393,340.323 v2(166.592,340.521)
DIN_LED3: LED1_LED3.4 LED21_LED2.2 | length 22.7
  Top Layer w0.559: LED21_LED2.2@470.948,294.342 v2@472.544,294.342 ; v2@491.077,293.884 LED1_LED3.4@492.672,293.884
  Bottom Layer w0.305: v2(472.544,294.345) 473.099,293.79 473.639,293.25 ccw(c474.944,294.555) 474.944,292.709 475.708,292.709 488.428,292.709 489.165,292.709 ccw(c489.165,294.487) 490.422,293.23 491.074,293.882 v2@491.074,293.889
  other v2: 491.077,293.887
DIN_LED4: LED1_LED4.4 LED21_LED3.2 | length 22.7
  Top Layer w0.559: LED21_LED3.2@636.52,186.259 v2@638.116,186.259 ; v2@648.339,174.888 LED1_LED4.4@649.935,174.888
  Bottom Layer w0.305: v2(638.116,186.256) 638.116,178.962 ccw(c640.656,178.962) 638.86,177.166 639.445,176.581 ccw(c640.655,177.791) 640.655,176.079 646.092,176.079 cw(c646.092,173.539) 647.888,175.335 v2(648.339,174.885)
DIN_LED5: LED1_LED5.4 LED21_LED4.2 | length 24.2
  Top Layer w0.559: LED1_LED5.4@618.877,132.244 v2@620.472,132.244 ; LED21_LED4.2@625.957,116.562 v2@627.553,116.562
  Bottom Layer w0.305: v2(620.472,132.247) 623.951,132.247 cw(c623.951,129.707) 625.747,131.503 626.849,130.401 cw(c625.15,128.702) 627.553,128.702 v2(627.553,116.565)
DIN_LED6: LED1_LED6.4 LED21_LED5.2 | length 17.5
  Top Layer w0.559: LED1_LED6.4@441.805,263.529 v2@443.4,263.529 ; v2@448.212,251.132 LED21_LED5.2@449.808,251.132
  Bottom Layer w0.305: v2(443.4,263.532) 447.468,259.464 cw(c445.672,257.668) 448.212,257.668 v2(448.212,251.135)
DIN_LED7: LED1_LED7.4 LED21_LED6.2 | length 18.3
  Top Layer w0.559: LED21_LED6.2@473.778,213.672 v2@475.374,213.672 ; LED1_LED7.4@475.324,199.142 v2@476.92,199.142
  Bottom Layer w0.305: v2(475.374,213.669) 475.374,201.736 ccw(c477.914,201.736) 476.118,199.94 v2(476.92,199.138)
DIN_LED8: LED1_LED8.4 LED21_LED7.2 | length 25.9
  Top Layer w0.559: LED21_LED7.2@250.06,112.233 LED21_LED7.2@250.06,112.233 252.22,112.231 v2(252.222,112.229) ; v2@257.803,132.06 LED1_LED8.4@259.399,132.06
  Bottom Layer w0.305: v2(252.222,112.229) 252.222,123.845 252.222,126.476 254.082,128.336 ; 254.083,128.337 v2(257.803,132.057)
DIN_LED9: LED1_LED9.4 LED21_LED8.2 | length 22
  Top Layer w0.559: LED21_LED8.2@197.782,276.156 197.782,274.578 198.548,273.812 v2(205.12,273.812) ; v2@208.502,263.937 LED1_LED9.4@210.097,263.937
  Bottom Layer w0.305: v2(205.12,273.812) 205.12,268.162 ccw(c207.15,268.162) 205.715,266.727 v2(208.502,263.94)
DOUT1_LED1: LED1_LED1.2 LED2_LED1.4 | length 27
  Top Layer w0.559: v2@4.092,227.545 LED1_LED1.2@5.688,227.545 ; v2@24.021,237.902 LED2_LED1.4@25.617,237.902
  Bottom Layer w0.305: v2(4.092,227.549) 4.805,227.549 ccw(c4.805,230.089) 6.601,228.293 14.32,236.011 cw(c15.621,234.711) 15.621,236.55 20.378,236.55 ccw(c20.378,238.371) 21.666,237.084 21.744,237.161 cw(c23.54,235.365) 23.54,237.905 v2(24.021,237.905)
DOUT1_LED2: LED1_LED2.2 LED2_LED2.4 | length 24.2
  Top Layer w0.559: LED1_LED2.2@163.187,337.218 v2@164.783,337.218 ; v2@182.822,344.811 LED2_LED2.4@184.418,344.811
  Bottom Layer w0.305: v2(164.783,337.215) 170.798,343.229 cw(c172.594,341.433) 172.594,343.973 180.929,343.973 ccw(c180.929,346.513) 182.726,344.717 v2(182.822,344.814)
DOUT1_LED3: LED1_LED3.2 LED2_LED3.4 | length 22.4
  Top Layer w0.559: LED1_LED3.2@487.672,290.584 v2@489.268,290.584 ; v2@507.333,289.337 LED2_LED3.4@508.928,289.337
  Bottom Layer w0.305: v2(489.268,290.587) 490.56,289.295 491.026,288.829 ccw(c492.15,289.953) 492.15,288.363 492.809,288.363 505.054,288.363 505.665,288.363 ccw(c505.665,290.03) 506.844,288.851 v2(507.333,289.34) v2(507.333,289.34)
DOUT1_LED4: LED1_LED4.2 LED2_LED4.4 | length 22.4
  Top Layer w0.559: LED1_LED4.2@644.935,171.588 v2@646.53,171.588 ; v2@656.046,159.744 LED2_LED4.4@657.642,159.744
  Bottom Layer w0.305: v2(646.53,171.585) 646.53,163.969 ccw(c649.07,163.969) 647.274,162.173 647.813,161.634 ccw(c649.609,163.43) 649.609,160.89 653.851,160.89 cw(c653.851,158.35) 655.647,160.146 v2(656.046,159.747)
DOUT1_LED5: LED1_LED5.2 LED2_LED5.4 | length 26.1
  Top Layer w0.559: LED2_LED5.4@607.861,145.7 615.365,145.7 615.461,145.796 v2(615.472,145.796) ; LED1_LED5.2@613.877,128.944 v2@615.472,128.944
  Bottom Layer w0.305: v2(615.472,128.947) v2(615.472,145.796)
DOUT1_LED6: LED1_LED6.2 LED2_LED6.4 | length 17.2
  Top Layer w0.559: LED2_LED6.4@428.571,272.238 v2@430.166,272.238 ; v2@435.209,260.229 LED1_LED6.2@436.805,260.229
  Bottom Layer w0.305: v2(430.166,272.241) 434.465,267.942 cw(c432.669,266.146) 435.209,266.146 v2(435.209,260.232)
DOUT1_LED7: LED1_LED7.2 LED2_LED7.4 | length 17.3
  Top Layer w0.559: LED2_LED7.4@470.295,181.768 v2@471.89,181.768 ; LED1_LED7.2@470.324,195.842 v2@471.92,195.842
  Bottom Layer w0.305: v2(471.89,181.765) ccw(c471.82,181.835) 471.92,181.835 v2(471.92,195.838)
DOUT1_LED8: LED1_LED8.2 LED2_LED8.4 | length 26.6
  Top Layer w0.559: LED1_LED8.2@254.399,128.76 v2@255.994,128.76 ; v2@262.705,148.494 LED2_LED8.4@264.301,148.494
  Bottom Layer w0.305: v2(255.994,128.757) 258.441,131.203 ccw(c256.645,132.999) 259.185,132.999 259.185,146.228 cw(c260.706,146.228) 259.63,147.304 260.547,148.221 cw(c261.687,145.951) 261.687,148.491 v2(262.705,148.491)
DOUT1_LED9: LED1_LED9.2 LED2_LED9.4 | length 15.8
  Top Layer w0.305: LED2_LED9.4@191.504,266.452 194.421,266.452 cw(c194.421,263.912) 196.217,265.708 200.543,261.381 ccw(c202.34,263.177) 202.181,260.642 ccw(c202.34,263.177) 202.34,260.637 LED1_LED9.2@205.097,260.637
DOUT2_LED1: LED2_LED1.2 LED3_LED1.4 | length 24.2
  Top Layer w0.559: LED2_LED1.2@20.617,234.602 v2@22.213,234.602 ; v2@39.495,244.203 LED3_LED1.4@41.091,244.203
  Bottom Layer w0.305: v2(22.213,234.605) 29.992,242.385 cw(c31.788,240.589) 31.788,243.129 37.373,243.129 ccw(c37.373,245.669) 39.169,243.873 v2(39.495,244.199)
DOUT2_LED2: LED2_LED2.2 LED3_LED2.4 | length 24
  Top Layer w0.559: LED2_LED2.2@179.418,341.511 v2@181.013,341.511 ; v2@199.332,348.062 LED3_LED2.4@200.928,348.062
  Bottom Layer w0.305: v2(181.013,341.507) 185.961,346.455 cw(c187.758,344.659) 187.758,347.199 197.421,347.199 ccw(c197.421,349.739) 199.217,347.943 v2(199.332,348.058)
DOUT2_LED3: LED2_LED3.2 LED3_LED3.4 | length 21.7
  Top Layer w0.559: LED2_LED3.2@503.928,286.037 v2@505.524,286.037 ; v2@523.411,284.054 LED3_LED3.4@525.006,284.054
  Bottom Layer w0.305: v2(505.524,286.04) ccw(c507.267,287.784) 507.267,285.318 521.098,285.318 cw(c521.098,282.778) 522.407,284.955 cw(c521.098,282.778) 522.894,284.574 v2(523.411,284.057)
DOUT2_LED4: LED2_LED4.2 LED3_LED4.4 | length 22.3
  Top Layer w0.559: LED2_LED4.2@652.642,156.444 v2@654.238,156.444 ; v2@663.018,144.278 LED3_LED4.4@664.614,144.278
  Bottom Layer w0.305: v2(654.238,156.447) 654.238,148.083 ccw(c656.778,148.083) 654.32,147.44 ccw(c656.778,148.083) 654.982,146.287 655.752,145.517 ccw(c656.12,145.885) 656.12,145.364 660.877,145.364 cw(c660.877,142.824) 662.673,144.62 v2(663.018,144.275)
DOUT2_LED5: LED2_LED5.2 LED3_LED5.4 | length 21.4
  Top Layer w0.559: LED3_LED5.4@598.184,160.305 v2@599.779,160.305 ; v2(599.948,154.432) 599.948,144.94 ccw(c602.488,144.94) 602.488,142.4 LED2_LED5.2@602.861,142.4
  Bottom Layer w0.305: v2(599.779,160.308) 599.779,160.229 599.948,160.06 v2(599.948,154.432)
DOUT2_LED6: LED2_LED6.2 LED3_LED6.4 | length 16.8
  Top Layer w0.559: LED3_LED6.4@415.134,280.509 v2@416.729,280.509 ; v2@421.975,268.938 LED2_LED6.2@423.571,268.938
  Bottom Layer w0.305: v2(416.729,280.513) 421.231,276.011 cw(c419.435,274.215) 421.975,274.215 v2(421.975,268.941)
DOUT2_LED7: LED2_LED7.2 LED3_LED7.4 | length 17.2
  Top Layer w0.559: LED3_LED7.4@463.437,165.08 v2@465.032,165.08 ; LED2_LED7.2@465.295,178.468 v2@466.89,178.468
  Bottom Layer w0.305: v2(465.032,165.077) 466.146,166.191 ccw(c464.35,167.987) 466.89,167.987 v2(466.89,178.465)
DOUT2_LED8: LED2_LED8.2 LED3_LED8.4 | length 25.4
  Top Layer w0.559: LED2_LED8.2@259.301,145.194 v2@260.896,145.194 ; v2@268.014,164.699 LED3_LED8.4@269.609,164.699
  Bottom Layer w0.305: v2(260.896,145.191) 263.47,147.764 ccw(c261.674,149.56) 264.214,149.56 264.214,159.844 cw(c266.754,159.844) 264.958,161.64 v2(268.014,164.696)
DOUT2_LED9: LED2_LED9.2 LED3_LED9.4 | length 14.2
  Top Layer w0.305: LED3_LED9.4@179.49,254.285 180.767,254.285 ccw(c180.767,256.825) 181.417,254.37 ccw(c180.767,256.825) 182.563,255.029 182.905,255.372 ccw(c182.17,256.107) 183.21,256.107 183.21,261.312 cw(c185.75,261.312) 183.446,262.381 183.649,262.584 cw(c185.02,261.213) 185.02,263.152 LED2_LED9.2@186.504,263.152
DOUT3_LED1: LED3_LED1.2 LED4_LED1.4 | length 24.2
  Top Layer w0.559: LED3_LED1.2@36.07,240.899 v2@37.666,240.899 ; v2@55.187,249.764 LED4_LED1.4@56.783,249.764
  Bottom Layer w0.305: v2(37.666,240.896) 44.819,248.049 cw(c46.615,246.253) 46.615,248.793 53.168,248.793 ccw(c53.168,251.333) 54.964,249.537 v2(55.187,249.76)
  Bottom Layer w0.559: v2@37.645,240.899 v2@37.654,240.908
DOUT3_LED2: LED3_LED2.2 LED4_LED2.4 | length 23.6
  Top Layer w0.559: LED3_LED2.2@195.928,344.762 v2@197.523,344.762 ; v2@215.893,350.221 LED4_LED2.4@217.489,350.221
  Bottom Layer w0.305: v2(197.523,344.758) 201.43,348.665 cw(c203.226,346.869) 203.226,349.409 214.032,349.409 ccw(c214.032,351.949) 215.829,350.153 v2(215.893,350.217)
DOUT3_LED3: LED3_LED3.2 LED4_LED3.4 | length 21.9
  Top Layer w0.559: LED3_LED3.2@520.006,280.754 v2@521.602,280.754 ; v2@539.26,277.78 LED4_LED3.4@540.856,277.78
  Bottom Layer w0.305: v2(521.602,280.757) 521.733,280.627 ccw(c523.529,282.423) 523.529,279.883 536.109,279.883 cw(c536.109,277.343) 537.905,279.139 v2(539.26,277.783)
DOUT3_LED4: LED3_LED4.2 LED4_LED4.4 | length 19
  Top Layer w0.559: LED3_LED4.2@659.614,140.978 v2@661.209,140.978 ; v2@669.345,128.458 LED4_LED4.4@670.941,128.458
  Bottom Layer w0.305: v2(661.209,140.975) 661.209,137.643 ccw(c663.749,137.643) 661.953,135.847 v2(669.345,128.455)
DOUT3_LED5: LED3_LED5.2 LED4_LED5.4 | length 23.3
  Top Layer w0.559: LED4_LED5.4@590.538,176.129 v2@592.134,176.129 ; LED3_LED5.2@593.184,157.005 v2@594.779,157.005
  Bottom Layer w0.305: v2(592.134,176.133) 594.035,174.231 cw(c592.239,172.435) 594.779,172.435 v2(594.779,157.008)
DOUT3_LED6: LED3_LED6.2 LED4_LED6.4 | length 16.5
  Top Layer w0.559: LED4_LED6.4@401.342,288.276 v2@402.937,288.276 ; v2@408.538,277.209 LED3_LED6.2@410.134,277.209
  Bottom Layer w0.305: v2(402.937,288.28) 407.794,283.423 cw(c405.998,281.627) 408.538,281.627 v2(408.538,277.213)
DOUT3_LED7: LED3_LED7.2 LED4_LED7.4 | length 17
  Top Layer w0.559: LED4_LED7.4@454.953,149.256 v2@456.549,149.256 ; LED3_LED7.2@458.437,161.78 v2@460.032,161.78
  Bottom Layer w0.305: v2(456.549,149.253) 456.549,157.241 cw(c459.089,157.241) 457.293,159.037 v2(460.032,161.777)
DOUT3_LED8: LED3_LED8.2 LED4_LED8.4 | length 25.6
  Top Layer w0.559: LED3_LED8.2@264.609,161.399 v2@266.205,161.399 ; v2@274.211,180.676 LED4_LED8.4@275.807,180.676
  Bottom Layer w0.305: v2(266.205,161.396) 271.976,167.167 ccw(c270.18,168.963) 272.428,167.781 ccw(c270.18,168.963) 272.72,168.963 272.72,178.136 cw(c275.26,178.136) 273.387,179.852 cw(c275.26,178.136) 273.464,179.932 v2(274.211,180.679)
DOUT3_LED9: LED3_LED9.2 LED4_LED9.4 | length 14.8
  Top Layer w0.305: LED4_LED9.4@166.765,242.804 168.95,242.804 ccw(c168.95,243.826) 169.672,243.103 ccw(c168.875,243.901) 170.002,243.901 170.002,249.141 cw(c172.542,249.141) 170.477,250.62 cw(c171.358,249.739) 171.358,250.985 LED3_LED9.2@174.49,250.985
DOUT4_LED1: LED4_LED1.2 LED5_LED1.4 | length 24.1
  Top Layer w0.559: LED4_LED1.2@51.783,246.464 v2@53.378,246.464 ; v2@71.037,254.869 LED5_LED1.4@72.632,254.869
  Bottom Layer w0.305: v2(53.378,246.46) 59.774,252.856 cw(c61.57,251.06) 61.57,253.6 68.719,253.6 ccw(c68.719,256.14) 70.435,254.268 ccw(c68.719,256.14) 70.515,254.344 v2(71.037,254.866)
  Bottom Layer w0.559: v2@71.035,254.868 v2@71.037,254.869
DOUT4_LED2: LED4_LED2.2 LED5_LED2.4 | length 23.3
  Top Layer w0.559: LED4_LED2.2@212.489,346.921 v2@214.084,346.921 ; v2@232.632,351.262 LED5_LED2.4@234.227,351.262
  Bottom Layer w0.305: v2(214.084,346.917) 216.899,349.732 cw(c218.695,347.936) 218.695,350.476 230.79,350.476 ccw(c230.79,353.016) 232.586,351.22 v2(232.632,351.266)
DOUT4_LED3: LED4_LED3.2 LED5_LED3.4 | length 21.9
  Top Layer w0.559: LED4_LED3.2@535.856,274.48 v2@537.452,274.48 ; v2@554.729,270.541 LED5_LED3.4@556.325,270.541
  Bottom Layer w0.305: v2(537.452,274.483) 538.319,273.616 ; 538.32,273.615 ccw(c540.115,275.412) 540.115,272.872 551.349,272.872 cw(c551.349,270.332) 553.145,272.128 v2(554.729,270.544)
DOUT4_LED4: LED4_LED4.2 LED5_LED4.4 | length 33.3
  Top Layer w0.559: LED4_LED4.2@665.941,125.158 v2@667.536,125.158 ; v2(686.953,118.872) 688.418,118.872 689.453,117.837 LED5_LED4.4@689.453,115.425
  Bottom Layer w0.305: v2(667.536,125.155) 669.381,127 682.443,127 682.445,127 cw(c682.444,122.491) 685.632,125.679 cw(c682.444,122.491) 686.953,122.492 686.953,122.49 v2(686.953,118.872)
DOUT4_LED5: LED4_LED5.2 LED5_LED5.4 | length 15.1
  Top Layer w0.559: LED5_LED5.4@575.679,180.803 v2@577.275,180.803 ; v2@583.943,172.829 LED4_LED5.2@585.538,172.829
  Bottom Layer w0.305: v2(577.275,180.806) 578.567,180.806 cw(c578.567,178.266) 580.363,180.062 583.199,177.226 cw(c581.403,175.43) 583.943,175.43 v2(583.943,172.833)
DOUT4_LED6: LED4_LED6.2 LED5_LED6.4 | length 16
  Top Layer w0.559: LED5_LED6.4@387.348,295.465 v2@388.944,295.465 ; v2@394.746,284.976 LED4_LED6.2@396.342,284.976
  Bottom Layer w0.305: v2(388.944,295.468) 394.002,290.41 cw(c392.206,288.614) 394.746,288.614 v2(394.746,284.98)
DOUT4_LED7: LED4_LED7.2 LED5_LED7.4 | length 15.8
  Top Layer w0.305: LED5_LED7.4@444.717,134.575 447.215,134.575 ccw(c447.215,134.903) 447.446,134.671 447.538,134.763 ccw(c446.411,135.89) 448.005,135.89 448.005,144.852 cw(c449.566,144.852) 448.238,145.672 ; 448.208,145.644 cw(c448.963,144.889) 448.238,145.672 ; LED4_LED7.2@449.953,145.956 448.963,145.956 ccw(c448.963,144.889) 448.238,145.672
DOUT4_LED8: LED4_LED8.2 LED5_LED8.4 | length 26.1
  Top Layer w0.559: LED4_LED8.2@270.807,177.376 v2(273.637,177.375) ; v2@280.688,196.373 LED5_LED8.4@282.284,196.373
  Bottom Layer w0.305: v2(273.637,177.375) 273.637,177.454 cw(c276.177,177.454) 274.381,179.25 277.182,182.05 277.182,191.811 cw(c279.722,191.811) 277.428,192.902 cw(c279.722,191.811) 277.926,193.607 v2(280.688,196.37)
DOUT4_LED9: LED4_LED9.2 LED5_LED9.4 | length 14
  Top Layer w0.305: LED5_LED9.4@153.557,232.085 155.632,232.085 ccw(c155.632,233.801) 156.845,232.588 ccw(c155.925,233.508) 157.226,233.508 157.226,237.303 cw(c159.394,237.303) 157.861,238.836 cw(c159.474,237.224) 159.474,239.504 LED4_LED9.2@161.765,239.504
DOUT5_LED1: LED5_LED1.2 LED6_LED1.4 | length 23.9
  Top Layer w0.559: LED5_LED1.2@67.632,251.569 v2@69.228,251.569 ; v2@86.963,259.34 LED6_LED1.4@88.558,259.34
  Bottom Layer w0.305: v2(69.228,251.566) 74.989,257.327 cw(c76.785,255.531) 76.785,258.071 84.645,258.071 ccw(c84.645,260.611) 86.361,258.738 ccw(c84.645,260.611) 86.441,258.815 v2(86.963,259.336)
  Bottom Layer w0.559: v2@86.961,259.338 v2@86.963,259.34
DOUT5_LED2: LED5_LED2.2 LED6_LED2.4 | length 22.8
  Top Layer w0.559: LED5_LED2.2@229.227,347.962 v2@230.823,347.962 ; v2@249.345,350.983 LED6_LED2.4@250.94,350.983
  Bottom Layer w0.305: v2(230.823,347.959) 232.393,349.529 cw(c234.189,347.733) 234.189,350.273 247.828,350.273 ccw(c247.828,352.212) v2@249.198,350.84 ; v2@249.199,350.841 v2(249.345,350.986)
DOUT5_LED3: LED5_LED3.2 LED6_LED3.4 | length 23
  Top Layer w0.559: LED5_LED3.2@551.325,267.241 v2@552.92,267.241 ; v2@569.615,262.143 LED6_LED3.4@571.211,262.143
  Bottom Layer w0.305: v2(552.92,267.244) 553.019,267.146 ccw(c554.815,268.942) 554.815,266.402 566.606,266.402 cw(c566.606,263.862) 568.402,265.658 568.96,265.1 cw(c567.378,263.518) 569.615,263.518 v2(569.615,262.146)
DOUT5_LED4: LED5_LED4.2 LED6_LED4.4 | length 29.2
  Top Layer w0.305: LED5_LED4.2@684.453,112.125 685.368,112.125 ccw(c685.368,113.182) 686.116,112.435 686.799,113.118 ; 686.799,113.119 cw(c687.629,112.288) 687.629,113.462 690.661,113.462 ccw(c690.661,114.849) 691.642,113.868 ccw(c690.6,114.911) 692.044,114.618 ccw(c690.6,114.911) 692.074,114.911 692.074,132.07 ccw(c690.946,132.07) 691.744,132.867 ccw(c690.476,131.6) 690.801,133.363 ccw(c690.476,131.6) 690.476,133.392 LED6_LED4.4@689.688,133.392
DOUT5_LED5: LED5_LED5.2 LED6_LED5.4 | length 15.6
  Top Layer w0.559: LED6_LED5.4@560.882,186.29 v2@562.478,186.29 ; v2@569.084,177.503 LED5_LED5.2@570.679,177.503
  Bottom Layer w0.305: v2(562.478,186.294) 563.275,186.294 cw(c563.275,183.754) 565.071,185.55 568.34,182.281 cw(c566.544,180.485) 569.084,180.485 v2(569.084,177.506)
DOUT5_LED6: LED5_LED6.2 LED6_LED6.4 | length 15.3
  Top Layer w0.559: LED6_LED6.4@372.965,301.864 v2@374.561,301.864 ; v2@380.753,292.165 LED5_LED6.2@382.348,292.165
  Bottom Layer w0.305: v2(374.561,301.867) 374.561,299.412 ccw(c377.101,299.412) 375.305,297.616 v2(380.753,292.168)
DOUT5_LED7: LED5_LED7.2 LED6_LED7.4 | length 14.4
  Top Layer w0.305: LED6_LED7.4@433.033,121.214 434.411,121.214 ccw(c434.411,123.754) 434.522,121.217 ccw(c434.411,123.754) 436.207,121.958 436.288,122.04 ccw(c434.492,123.836) 437.032,123.836 437.032,128.57 cw(c439.374,128.57) 437.718,130.226 438.096,130.603 cw(c439.717,128.982) LED5_LED7.2@439.717,131.275
DOUT5_LED8: LED5_LED8.2 LED6_LED8.4 | length 25.6
  Top Layer w0.559: LED5_LED8.2@277.284,193.073 v2@278.88,193.073 ; v2@287.978,211.816 LED6_LED8.4@289.574,211.816
  Bottom Layer w0.305: v2(278.88,193.076) 282.647,196.844 ccw(c280.851,198.64) 283.391,198.64 283.391,206.858 cw(c284.295,206.858) 283.611,207.449 cw(c284.295,206.858) 283.656,207.497 ; 283.656,207.497 v2(287.978,211.82)
DOUT5_LED9: LED5_LED9.2 LED6_LED9.4 | length 13.8
  Top Layer w0.305: LED6_LED9.4@139.841,222.002 143.403,222.002 ccw(c143.403,222.763) 143.942,222.225 143.96,222.243 ccw(c142.164,224.039) 144.704,224.039 144.704,226.362 cw(c147.244,226.362) 145.448,228.158 145.716,228.426 cw(c146.583,227.559) 146.583,228.785 LED5_LED9.2@148.557,228.785
DOUT6_LED1: LED6_LED1.2 LED7_LED1.4 | length 24.1
  Top Layer w0.559: LED6_LED1.2@83.558,256.04 v2@85.154,256.04 ; v2@103.168,263.404 LED7_LED1.4@104.763,263.404
  Bottom Layer w0.305: v2(85.154,256.036) 90.559,261.441 cw(c92.355,259.645) 92.355,262.185 101.067,262.185 ccw(c101.067,264.309) 102.568,262.807 v2(103.168,263.407)
DOUT6_LED2: LED6_LED2.2 LED7_LED2.4 | length 22.7
  Top Layer w0.559: LED6_LED2.2@245.94,347.683 v2@247.536,347.683 ; v2@266.083,349.332 LED7_LED2.4@267.679,349.332
  Bottom Layer w0.305: v2(247.536,347.686) cw(c249.185,347.686) 249.185,349.335 v2(266.083,349.335)